# Altium PCB Linux-Capable-Businnes-Card.PcbDoc (part 3 of 4)
Units mil, origin at the board's own origin, x right, y up, seen from the top; angles counter-clockwise.
Board outline 3385.83 x 2125.98 mil, 4 copper layers (L1 (TOP), L2 (GND), L3 (PWR), L4 (BOTTOM)), stack 38.228 mil thick; 154 components, 143 nets, 726 pads, 351 vias.
Unrouted connection lines stored in the file: 1.
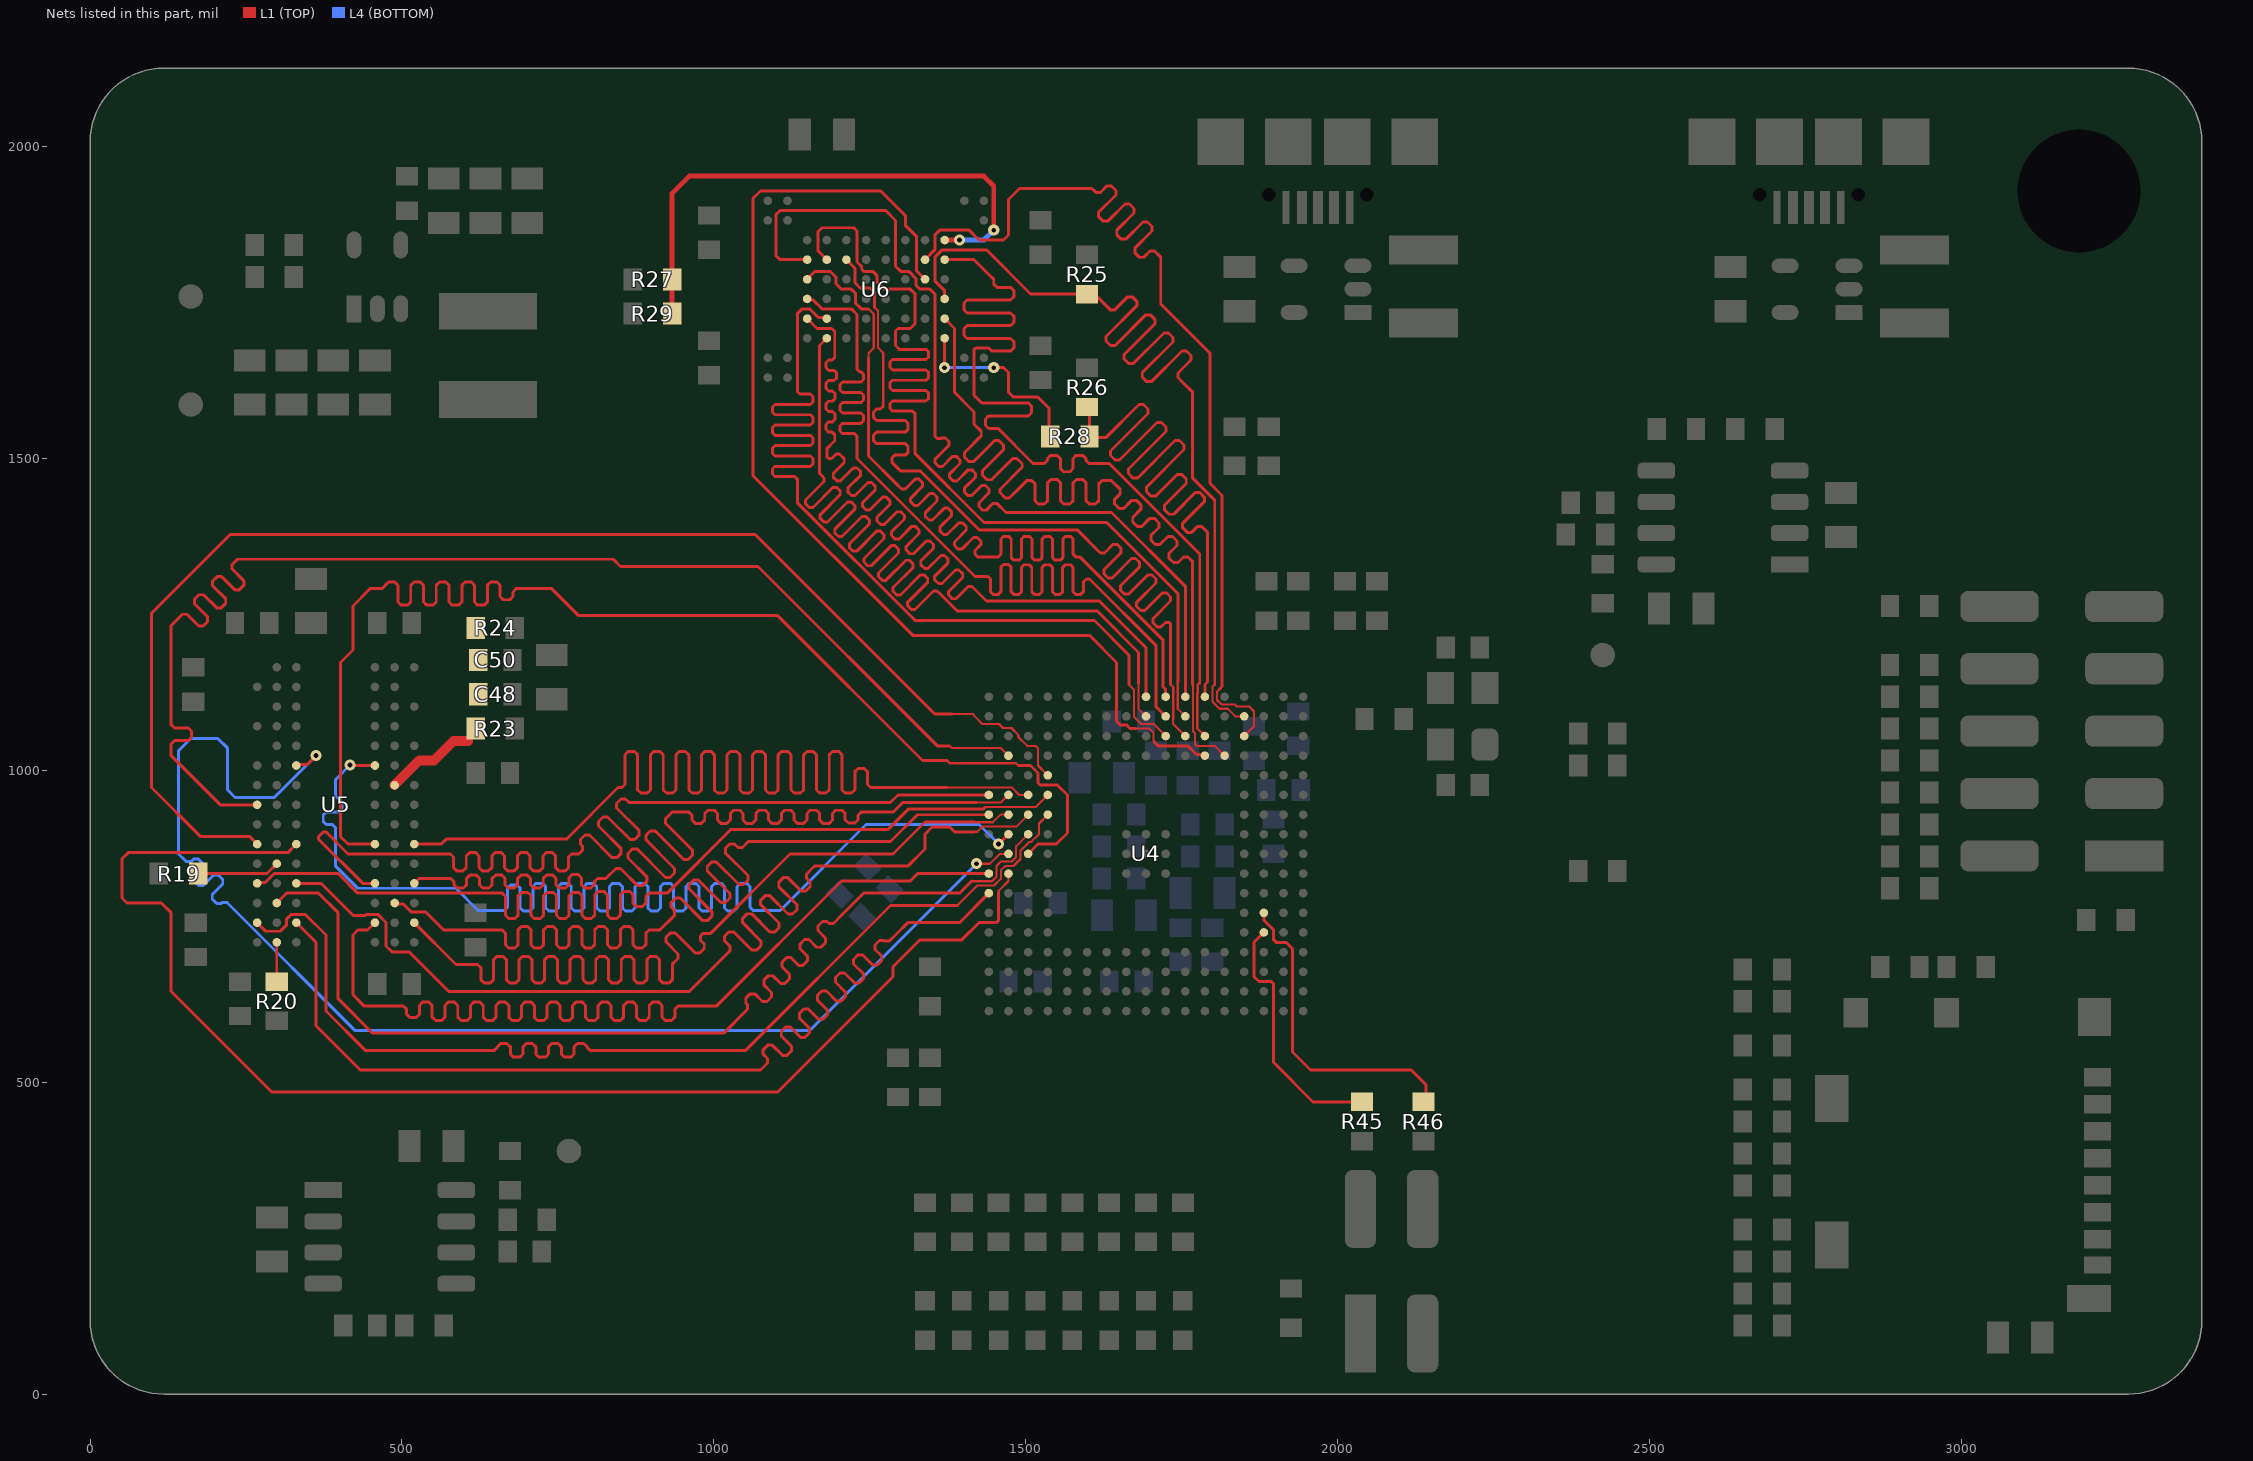
[diagram p5: the nets of this part, all layers, seen from the top]

## Via types
v1: diameter 17.72, hole 7.87, L1 (TOP) to L4 (BOTTOM), tented both sides, 280 vias
v2: diameter 25.59, hole 11.81, L1 (TOP) to L4 (BOTTOM), tented both sides, 71 vias

## Nets (pads, with @x,y where several pads share a name; then routed paths per layer and width w, separated by ;. In a path a pad name is that pad's centre, name@x,y a point inside that pad or via, vN(x,y) a via of type N, cw(c..) or ccw(c..) an arc to the next point about the centre after c; other vN are vias at no path point) (continued)
DRAM_D5: U4.B14 U5.H9 | length 2146.5
  L1 (TOP) w3.54: 1377.95,1039.37 1381.5,1035.83 1460.24,1035.83 U4.B14@1472.44,1023.62
  L1 (TOP) w4.72: U5.H9@267.72,944.88 208.66,944.88 133.86,1019.69 129.92,1023.62 129.92,1042.52 135.04,1047.64 157.29,1047.64 162.4,1052.76 162.4,1062.99 157.29,1068.11 135.04,1068.11 129.92,1073.23 129.92,1078.74 129.92,1232.28 131.89,1234.25 148.04,1250.4 155.27,1250.4 173.99,1231.68 181.23,1231.68 188.47,1238.92 188.47,1246.16 167.42,1267.21 167.42,1274.44 174.66,1281.68 181.9,1281.68 202.94,1260.64 210.18,1260.64 217.42,1267.87 217.42,1275.11 196.37,1296.16 196.37,1303.4 203.61,1310.63 210.85,1310.63 231.89,1289.59 239.13,1289.59 246.37,1296.83 246.37,1304.06 227.66,1322.78 227.66,1330.02 232.28,1334.65 236.22,1338.58 838.58,1338.58 850.39,1326.77 1070.87,1326.77 1358.27,1039.37 1377.95,1039.37
DRAM_D6: U4.C12 U5.F1 | length 2165.2
  L1 (TOP) w3.54: 1374.02,972.44 1425.56,972.44 1425.95,972.83 1477.5,972.83 1489.7,960.63 U4.C12@1503.94,960.63
  L1 (TOP) w4.72: U5.F1@519.69,881.89 562.99,881.89 570.87,889.76 763.78,889.76 846.46,972.44 850,972.44 852.36,972.44 857.48,977.56 857.48,1025.01 862.6,1030.12 872.84,1030.12 877.95,1025.01 877.95,968.74 883.07,963.63 893.31,963.63 898.43,968.74 898.43,1025.01 903.54,1030.12 913.78,1030.12 918.9,1025.01 918.9,968.74 924.02,963.63 934.25,963.63 939.37,968.74 939.37,1025.01 944.49,1030.12 954.72,1030.12 959.84,1025.01 959.84,968.74 964.96,963.63 975.2,963.63 980.32,968.74 980.32,1025.01 985.43,1030.12 995.67,1030.12 1000.79,1025.01 1000.79,968.74 1005.91,963.63 1016.14,963.63 1021.26,968.74 1021.26,1025.01 1026.38,1030.12 1036.61,1030.12 1041.73,1025.01 1041.73,968.74 1046.85,963.63 1057.09,963.63 1062.2,968.74 1062.2,1025.01 1067.32,1030.12 1077.56,1030.12 1082.68,1025.01 1082.68,968.74 1087.8,963.63 1098.03,963.63 1103.15,968.74 1103.15,1025.01 1108.27,1030.12 1118.5,1030.12 1123.62,1025.01 1123.62,968.74 1128.74,963.63 1138.98,963.63 1144.09,968.74 1144.09,1025.01 1149.21,1030.12 1159.45,1030.12 1164.57,1025.01 1164.57,968.74 1169.68,963.63 1179.92,963.63 1185.04,968.74 1185.04,1025.01 1190.16,1030.12 1200.39,1030.12 1205.51,1025.01 1205.51,968.74 1210.63,963.63 1220.87,963.63 1225.98,968.74 1225.98,997.89 1231.1,1003.01 1241.34,1003.01 1246.46,997.89 1246.46,977.56 1251.57,972.44 1255.51,972.44 1374.02,972.44
DRAM_D7: U4.D13 U5.F9 | length 2154
  L1 (TOP) w3.54: 1381.89,1090.55 1415.25,1090.55 1417.32,1088.48 1417.32,1087.62 1430.53,1074.41 1457.09,1074.41 1463.64,1067.86 1477.31,1067.86 1488.19,1056.98 1488.19,1053.61 1502.42,1039.37 1515.75,1039.37 1519.69,1035.43 1519.69,1007.87 U4.D13@1535.43,992.13
  L1 (TOP) w4.72: U5.F9@267.72,881.89 255.91,893.7 177.17,893.7 98.43,972.44 98.43,1251.97 224.41,1377.95 1066.93,1377.95 1354.33,1090.55 1381.89,1090.55
DRAM_D8: U4.C10 U5.C8 | length 1725.8
  L1 (TOP) w3.54: 1412.99,822.44 1446,822.44 1453.15,829.59 1453.15,846.85 1460.24,853.94 1477.5,853.94 1484.65,861.09 1484.65,878.35 U4.C10@1503.94,897.64
  L1 (TOP) w4.72: U5.C8@299.21,787.4 314.96,803.15 366.14,803.15 397.64,771.65 397.64,633.86 452.76,578.74 1015.75,578.74 1052.48,615.47 1054.15,617.14 1054.15,624.38 1051.18,627.34 1051.18,634.58 1058.42,641.82 1065.66,641.82 1077.83,629.64 1085.07,629.64 1092.31,636.88 1092.31,644.12 1080.13,656.3 1080.13,663.54 1087.37,670.77 1094.61,670.77 1106.79,658.6 1114.02,658.6 1121.26,665.83 1121.26,673.07 1109.09,685.25 1109.09,692.49 1116.32,699.73 1123.56,699.73 1135.74,687.55 1142.98,687.55 1150.22,694.79 1150.22,702.02 1138.04,714.2 1138.04,721.44 1145.28,728.68 1152.51,728.68 1164.69,716.5 1171.93,716.5 1179.17,723.74 1179.17,730.98 1166.99,743.15 1166.99,750.39 1174.23,757.63 1181.47,757.63 1184.43,754.66 1191.67,754.66 1206.69,769.69 1240.16,803.15 1393.7,803.15 1412.99,822.44
DRAM_D9: U4.A11 U5.C2 | length 1732.9
  L1 (TOP) w4.72: U5.C2@488.19,787.4 489.92,785.67 501.93,785.67 514.77,772.83 538.19,772.83 566.93,744.09 637.8,744.09 660.63,744.09 665.75,738.98 665.75,720.57 670.87,715.45 681.1,715.45 686.22,720.57 686.22,744.6 691.34,749.71 701.58,749.71 706.69,744.6 706.69,720.57 711.81,715.45 722.05,715.45 727.17,720.57 727.17,744.6 732.28,749.71 742.52,749.71 747.64,744.6 747.64,720.57 752.76,715.45 762.99,715.45 768.11,720.57 768.11,744.6 773.23,749.71 783.46,749.71 788.58,744.6 788.58,720.57 793.7,715.45 803.94,715.45 809.06,720.57 809.06,744.6 814.17,749.71 824.41,749.71 829.53,744.6 829.53,720.57 834.65,715.45 844.88,715.45 850,720.57 850,744.6 855.12,749.71 865.35,749.71 870.47,744.6 870.47,720.57 875.59,715.45 885.83,715.45 890.94,720.57 890.94,738.98 896.06,744.09 902.65,744.09 913.39,744.09 935.55,766.26 937.22,767.93 937.22,775.16 931.54,780.84 931.54,788.08 938.78,795.32 946.02,795.32 982.27,759.06 989.51,759.06 996.75,766.3 996.75,773.54 960.49,809.8 960.49,817.03 967.73,824.27 974.97,824.27 1011.22,788.02 1018.46,788.02 1025.7,795.25 1025.7,802.49 989.44,838.75 989.44,845.99 996.68,853.22 1003.92,853.22 1040.18,816.97 1047.42,816.97 1054.65,824.21 1054.65,831.44 1018.4,867.7 1018.4,874.94 1025.64,882.18 1032.87,882.18 1038.55,876.5 1045.79,876.5 1055.12,885.83 1283.46,885.83 1326.57,928.94 1440.75,928.94 U4.A11@1440.94,929.13
DRAM_D10: U4.C11 U5.D7 | length 1744.5
  L1 (TOP) w3.54: 1417.32,901.57 1422.43,901.57 1430.69,909.84 1484.65,909.84 U4.C11@1503.94,929.13
  L1 (TOP) w4.72: U5.D7@330.71,818.9 370.08,818.9 421.26,767.72 441.13,767.72 442.12,768.7 461.99,768.7 474.41,756.28 474.41,718.5 484.25,708.66 511.81,708.66 574.8,645.67 960.63,645.67 1024.16,709.2 1025.83,710.87 1025.83,718.11 1017.23,726.71 1017.23,733.95 1024.46,741.19 1031.7,741.19 1061.18,711.71 1068.42,711.71 1075.66,718.95 1075.66,726.19 1046.18,755.67 1046.18,762.9 1053.42,770.14 1060.65,770.14 1090.13,740.66 1097.37,740.66 1104.61,747.9 1104.61,755.14 1075.13,784.62 1075.13,791.86 1082.37,799.09 1089.61,799.09 1119.08,769.62 1126.32,769.62 1133.56,776.85 1133.56,784.09 1104.08,813.57 1104.08,820.81 1111.32,828.05 1118.56,828.05 1140.15,806.46 1147.38,806.46 1154.62,813.7 1154.62,820.93 1148.88,826.68 1148.88,833.92 1157.48,842.52 1161.42,846.46 1311.02,846.46 1338.58,874.02 1338.58,897.64 1350,909.06 1378.35,909.06 1385.83,901.57 1417.32,901.57
DRAM_D11: U4.A12 U5.D3 | length 1724.1
  L1 (TOP) w4.72: U5.D3@456.69,818.9 437.01,818.9 366.13,889.78 366.13,893.69 374.03,901.59 377.94,901.59 413.39,866.14 554.62,866.14 577.46,866.14 582.57,861.02 582.57,844.09 587.69,838.98 597.93,838.98 603.05,844.09 603.05,862.92 608.16,868.04 618.4,868.04 623.52,862.92 623.52,844.09 628.64,838.98 638.87,838.98 643.99,844.09 643.99,862.92 649.11,868.04 659.35,868.04 664.46,862.92 664.46,844.09 669.58,838.98 679.82,838.98 684.94,844.09 684.94,862.92 690.05,868.04 700.29,868.04 705.41,862.92 705.41,844.09 710.53,838.98 720.76,838.98 725.88,844.09 725.88,862.92 731,868.04 741.24,868.04 746.35,862.92 746.35,844.09 751.47,838.98 761.71,838.98 766.83,844.09 766.83,861.02 771.94,866.14 782.65,866.14 783.46,866.14 787.4,870.08 789.07,871.75 789.07,878.99 786.11,881.95 786.11,889.19 793.34,896.43 800.58,896.43 836.93,860.09 844.16,860.09 851.4,867.32 851.4,874.56 815.06,910.91 815.06,918.14 822.3,925.38 829.53,925.38 865.88,889.04 873.12,889.04 880.35,896.28 880.35,903.51 844.01,939.86 844.01,947.1 851.25,954.34 858.49,954.34 864,948.82 871.24,948.82 877.95,948.82 1283.46,948.82 1295.28,960.63 U4.A12@1440.94,960.63
DRAM_D12: U4.B12 U5.D1 | length 1744.5
  L1 (TOP) w3.54: 1421.26,948.82 1421.65,948.43 1460.24,948.43 U4.B12@1472.44,960.63
  L1 (TOP) w4.72: U5.D1@519.69,818.9 527.56,826.77 555.23,826.77 578.07,826.77 583.18,821.65 583.18,816.54 588.3,811.42 598.54,811.42 603.66,816.54 603.66,826.93 608.77,832.05 619.01,832.05 624.13,826.93 624.13,816.54 629.25,811.42 639.48,811.42 644.6,816.54 644.6,826.93 649.72,832.05 659.96,832.05 665.07,826.93 665.07,816.54 670.19,811.42 680.43,811.42 685.55,816.54 685.55,826.93 690.66,832.05 700.9,832.05 706.02,826.93 706.02,816.54 711.14,811.42 721.37,811.42 726.49,816.54 726.49,826.93 731.61,832.05 741.85,832.05 746.96,826.93 746.96,816.54 752.08,811.42 762.32,811.42 767.44,816.54 767.44,827.71 772.55,832.82 782.79,832.82 787.91,827.71 787.91,816.54 793.03,811.42 803.26,811.42 808.38,816.54 808.38,821.65 813.5,826.77 816.47,826.77 826.77,826.77 842.92,842.92 850.16,842.92 878.04,815.04 885.28,815.04 892.51,822.27 892.51,829.51 862.28,859.75 862.28,866.99 869.52,874.22 876.76,874.22 922.64,828.34 929.88,828.34 937.12,835.58 937.12,842.82 891.23,888.7 891.23,895.94 898.47,903.18 905.71,903.18 951.59,857.29 958.83,857.29 966.07,864.53 966.07,871.77 922.54,915.3 922.54,922.54 933.07,933.07 936.68,933.07 937.01,933.07 959.84,933.07 964.96,927.95 964.96,920.31 970.08,915.19 980.32,915.19 985.43,920.31 985.43,931 990.55,936.12 1000.79,936.12 1005.91,931 1005.91,920.31 1011.02,915.19 1021.26,915.19 1026.38,920.31 1026.38,931 1031.5,936.12 1041.73,936.12 1046.85,931 1046.85,920.31 1051.97,915.19 1062.21,915.19 1067.32,920.31 1067.32,931 1072.44,936.12 1082.68,936.12 1087.8,931 1087.8,920.31 1092.91,915.19 1103.15,915.19 1108.27,920.31 1108.27,931 1113.39,936.12 1123.62,936.12 1128.74,931 1128.74,920.31 1133.86,915.19 1144.09,915.19 1149.21,920.31 1149.21,931 1154.33,936.12 1164.57,936.12 1169.69,931 1169.69,920.31 1174.8,915.19 1185.04,915.19 1190.16,920.31 1190.16,931 1195.28,936.12 1205.51,936.12 1210.63,931 1210.63,920.68 1215.75,915.56 1225.98,915.56 1231.1,920.68 1231.1,927.95 1236.22,933.07 1248.07,933.07 1287.4,933.07 1303.15,948.82 1421.26,948.82
DRAM_D13: U4.D12 U5.D9 | length 1744.9
  L1 (TOP) w3.54: 1434.88,940.33 1435.89,941.34 1516.14,941.34 U4.D12@1535.43,960.63
  L1 (TOP) w4.72: U5.D9@267.72,818.9 269.45,820.63 281.35,820.63 295.36,834.65 397.64,834.65 429.13,803.15 637.8,803.15 660.63,803.15 665.75,798.03 665.75,767.86 670.87,762.74 681.1,762.74 686.22,767.86 686.22,799.33 691.34,804.44 701.58,804.44 706.69,799.33 706.69,767.86 711.81,762.74 722.05,762.74 727.17,767.86 727.17,799.33 732.28,804.44 742.52,804.44 747.64,799.33 747.64,767.86 752.76,762.74 762.99,762.74 768.11,767.86 768.11,799.33 773.23,804.44 783.46,804.44 788.58,799.33 788.58,767.86 793.7,762.74 803.94,762.74 809.06,767.86 809.06,800.4 814.17,805.52 824.41,805.52 829.53,800.4 829.53,767.86 834.65,762.74 844.88,762.74 850,767.86 850,800.8 855.12,805.92 865.35,805.92 870.47,800.8 870.47,787.06 875.59,781.94 885.83,781.94 890.94,787.06 890.94,798.03 896.06,803.15 909.95,803.15 925.2,803.15 1027.56,905.51 1279.53,905.51 1311.81,937.8 1431.51,937.8 1434.46,940.75
DRAM_D14: U4.B11 U5.B1 | length 1731.3
  L1 (TOP) w3.54: 1417.72,916.93 1447.24,916.93 1459.44,929.13 U4.B11@1472.44,929.13
  L1 (TOP) w4.72: U5.B1@519.69,755.91 586.61,688.98 598.43,688.98 621.26,688.98 626.38,683.86 626.38,664.48 631.5,659.37 641.73,659.37 646.85,664.48 646.85,696.4 651.97,701.51 662.21,701.51 667.32,696.4 667.32,664.48 672.44,659.37 682.68,659.37 687.8,664.48 687.8,696.4 692.91,701.51 703.15,701.51 708.27,696.4 708.27,664.48 713.39,659.37 723.62,659.37 728.74,664.48 728.74,696.4 733.86,701.51 744.09,701.51 749.21,696.4 749.21,664.48 754.33,659.37 764.57,659.37 769.69,664.48 769.69,696.4 774.8,701.51 785.04,701.51 790.16,696.4 790.16,664.48 795.28,659.37 805.51,659.37 810.63,664.48 810.63,696.4 815.75,701.51 825.98,701.51 831.1,696.4 831.1,664.48 836.22,659.37 846.46,659.37 851.57,664.48 851.57,696.4 856.69,701.51 866.93,701.51 872.05,696.4 872.05,664.48 877.17,659.37 887.4,659.37 892.52,664.48 892.52,696.4 897.64,701.51 907.87,701.51 912.99,696.4 912.99,664.48 918.11,659.37 928.35,659.37 933.46,664.48 933.46,689.37 940.94,696.85 942.62,698.52 942.62,705.76 923.2,725.18 923.2,732.41 930.44,739.65 937.68,739.65 970.17,707.16 977.41,707.16 984.65,714.39 984.65,721.63 978.81,727.47 978.81,734.71 982.26,738.17 994.07,738.17 1122.05,866.14 1287.4,866.14 1338.58,917.32 1417.32,917.32 1417.72,916.93
DRAM_D15: U4.D11 U5.B9 | length 1739.7
  L1 (TOP) w3.54: 1390.37,783.46 1422.26,815.35 1449.21,815.35 1460.24,826.38 1460.24,839.7 1467.39,846.85 1477.5,846.85 1477.63,846.71 1480.57,846.71 1491.73,857.87 1491.73,871.2 1505.97,885.43 1508.99,885.43 1521.23,897.67 1521.23,914.93 U4.D11@1535.43,929.13
  L1 (TOP) w4.72: U5.B9@267.72,755.91 281.5,742.13 304.92,742.13 315.16,752.37 315.16,762.02 321.85,768.71 345.47,768.7 377.95,736.22 377.95,614.17 440.94,551.18 645.67,551.18 648.03,551.18 653.15,556.3 653.15,557.08 658.27,562.2 668.5,562.2 673.62,557.08 673.62,545.39 678.74,540.28 688.98,540.28 694.09,545.39 694.09,557.08 699.21,562.2 709.45,562.2 714.57,557.08 714.57,545.39 719.69,540.28 729.92,540.28 735.04,545.39 735.04,557.08 740.16,562.2 750.39,562.2 755.51,557.08 755.51,545.39 760.63,540.28 770.87,540.28 775.98,545.39 775.98,557.08 781.1,562.2 791.34,562.2 796.46,557.08 796.46,556.3 801.57,551.18 894.65,551.18 1051.18,551.18 1283.46,783.46 1390.37,783.46
DRAM_LDM: U4.C9 U5.F3 | length 2165.2
  L1 (TOP) w3.54: 1377.95,1011.81 1378.35,1011.42 1484.65,1011.42 1488.19,1007.87
  L1 (TOP) w4.72: U5.F3@456.69,881.89 413.39,881.89 401.57,893.7 401.57,1173.23 421.26,1192.91 421.26,1263.78 448.82,1291.34 465.58,1291.34 467.94,1291.34 473.06,1296.46 473.06,1296.8 478.18,1301.92 488.41,1301.92 493.53,1296.8 493.53,1270.12 498.65,1265 508.88,1265 514,1270.12 514,1296.8 519.12,1301.92 529.36,1301.92 534.47,1296.8 534.47,1270.12 539.59,1265 549.83,1265 554.95,1270.12 554.95,1296.8 560.06,1301.92 570.3,1301.92 575.42,1296.8 575.42,1270.12 580.54,1265 590.77,1265 595.89,1270.12 595.89,1296.8 601.01,1301.92 611.25,1301.92 616.36,1296.8 616.36,1270.12 621.48,1265 631.72,1265 636.84,1270.12 636.84,1296.8 641.95,1301.92 652.19,1301.92 657.31,1296.8 657.31,1278.79 662.43,1273.67 672.66,1273.67 677.78,1278.79 677.78,1286.22 682.9,1291.34 700.09,1291.34 740.16,1291.34 783.46,1248.03 1102.36,1248.03 1334.65,1015.75 1374.02,1015.75 1377.95,1011.81 ; 1488.19,1007.87 1507.87,1007.87 1519.69,996.06 1519.69,980.31 1523.62,976.38 1551.18,976.38 1566.93,960.63 1566.93,899.84 1548.98,881.89 1519.69,881.89 U4.C9@1503.94,866.14
DRAM_LDQSn: R19.2 U5.E8 | length 135
  L1 (TOP) w4.72: R19.2@173.23,834.65 283.46,834.65 U5.E8@299.21,850.39 U5.E8@300.95,852.13
DRAM_LDQSp: U4.B8 U5.F7 | length 2165.2
  L1 (TOP) w3.54: 1456.69,803.15 1456.69,807.09 1472.44,822.83 U4.B8@1472.44,834.65
  L1 (TOP) w4.72: U5.F7@330.71,881.89 316.93,868.11 61.02,868.11 51.18,858.27 51.18,795.28 59.06,787.4 114.17,787.4 129.92,771.65 129.92,645.67 291.34,484.25 1102.36,484.25 1287.4,669.29 1287.4,685.04 1330.71,728.35 1397.64,728.35 1425.2,755.91 1452.76,755.91 1456.69,759.84 1456.69,803.15
DRAM_RAS: U4.B9 U5.K7 | length 2198.6
  L1 (TOP) w3.54: v1(1421.26,850.39) 1442.46,850.39 1458.2,866.14 U4.B9@1472.44,866.14
  L1 (TOP) w4.72: U5.K7@332.44,1009.61 348.19,1009.61 v1(362.2,1023.62)
  L4 (BOTTOM) w4.72: v1(362.2,1023.62) 295.28,956.69 232.28,956.69 220.47,968.5 220.47,1035.43 204.72,1051.18 161.42,1051.18 141.73,1031.5 141.73,866.14 152.04,855.84 154.27,853.6 161.51,853.6 166.08,858.17 173.32,858.17 180.56,850.93 180.56,843.69 166.84,829.98 166.84,822.74 174.08,815.5 181.32,815.5 198.16,832.35 205.4,832.35 212.64,825.11 212.64,817.87 195.79,801.03 195.79,793.79 203.03,786.55 210.27,786.55 212.18,788.46 219.42,788.46 221.09,786.79 425.2,582.68 1153.54,582.68 1334.65,763.78 v1(1421.26,850.39)
DRAM_UDM: U4.A8 U5.B3 | length 1744.5
  L1 (TOP) w4.72: U5.B3@456.69,755.91 444.88,744.09 429.13,744.09 421.26,736.22 421.26,640.44 439.66,622.05 484.56,622.05 502.36,622.05 507.48,616.93 507.48,608.86 512.6,603.74 522.84,603.74 527.95,608.86 527.95,623.26 533.07,628.37 543.31,628.37 548.43,623.26 548.43,604.24 553.54,599.12 563.78,599.12 568.9,604.24 568.9,623.26 574.02,628.37 584.25,628.37 589.37,623.26 589.37,604.24 594.49,599.12 604.72,599.12 609.84,604.24 609.84,623.26 614.96,628.37 625.2,628.37 630.32,623.26 630.32,604.24 635.43,599.12 645.67,599.12 650.79,604.24 650.79,623.26 655.91,628.37 666.14,628.37 671.26,623.26 671.26,604.24 676.38,599.12 686.61,599.12 691.73,604.24 691.73,623.26 696.85,628.37 707.09,628.37 712.2,623.26 712.2,604.24 717.32,599.12 727.56,599.12 732.68,604.24 732.68,623.26 737.8,628.37 748.03,628.37 753.15,623.26 753.15,604.24 758.27,599.12 768.5,599.12 773.62,604.24 773.62,623.26 778.74,628.37 788.98,628.37 794.09,623.26 794.09,604.24 799.21,599.12 809.45,599.12 814.57,604.24 814.57,623.26 819.68,628.37 829.92,628.37 835.04,623.26 835.04,604.24 840.16,599.12 850.39,599.12 855.51,604.24 855.51,623.26 860.63,628.37 870.87,628.37 875.98,623.26 875.98,604.24 881.1,599.12 891.34,599.12 896.46,604.24 896.46,623.26 901.57,628.37 911.81,628.37 916.93,623.26 916.93,604.24 922.05,599.12 932.28,599.12 937.4,604.24 937.4,616.93 942.52,622.05 944.88,622.05 1003.94,622.05 1204.72,822.83 1314.96,822.83 1326.77,834.65 U4.A8@1440.94,834.65
DRAM_UDQSn: R20.2 U5.A8 | length 63
  L1 (TOP) w4.72: R20.2@299.21,661.42 U5.A8@299.21,724.41
DRAM_UDQSp: U4.A7 U5.B7 | length 1744.5
  L1 (TOP) w4.72: U5.B7@330.71,755.91 362.2,724.41 362.2,590.55 433.07,519.69 1074.8,519.69 1084.33,529.21 1086,530.88 1086,538.12 1079.1,545.02 1079.09,552.26 1086.33,559.5 1093.57,559.5 1109.95,543.12 1117.19,543.12 1124.42,550.36 1124.42,557.6 1108.05,573.98 1108.05,581.21 1115.29,588.45 1122.52,588.45 1138.9,572.07 1146.14,572.07 1153.38,579.31 1153.38,586.55 1137,602.93 1137,610.17 1144.24,617.4 1151.48,617.4 1167.85,601.03 1175.09,601.03 1182.33,608.26 1182.33,615.5 1165.95,631.88 1165.95,639.12 1173.19,646.36 1180.43,646.36 1196.81,629.98 1204.04,629.98 1211.28,637.22 1211.28,644.45 1194.9,660.83 1194.9,668.07 1202.14,675.31 1209.38,675.31 1225.76,658.93 1233,658.93 1240.23,666.17 1240.23,673.41 1223.86,689.78 1223.86,697.02 1231.09,704.26 1238.33,704.26 1254.71,687.88 1261.95,687.88 1269.19,695.12 1269.19,702.36 1258.55,712.99 1258.55,720.23 1265.79,727.47 1273.03,727.47 1274.19,726.31 1281.43,726.31 1292.91,737.79 1311.02,755.91 1393.7,755.91 U4.A7@1440.94,803.15
DRAM_VREF: C48.1 C50.2 R23.1 R24.2 U5.J2 | length 147.5
  L1 (TOP) w15.75: U5.J2@488.19,976.38 527.56,1015.75 551.18,1015.75 582.68,1047.24 606.3,1047.24
DRAM_WE: U4.B10 U5.K3 | length 2199.7
  L1 (TOP) w4.72: v1@417.32,1007.87 U5.K3@456.69,1007.87 ; v1(1456.69,881.89) U4.B10@1472.44,897.64
  L4 (BOTTOM) w4.72: v1(416.73,1008.47) 393.7,985.45 393.7,959.06 398.82,953.94 403.94,948.82 403.94,938.58 398.82,933.46 378.88,933.46 373.76,928.35 373.76,918.11 378.88,912.99 388.58,912.99 393.7,907.87 393.7,846.46 429.13,811.02 586.61,811.02 622.05,775.59 625.98,775.59 663.86,775.59 668.98,780.71 668.98,811.32 674.1,816.44 684.34,816.44 689.45,811.32 689.45,779.58 694.57,774.46 704.81,774.46 709.93,779.58 709.93,813.78 715.05,818.9 725.28,818.9 730.4,813.78 730.4,779.58 735.52,774.46 745.75,774.46 750.87,779.58 750.87,813.78 755.99,818.9 766.23,818.9 771.34,813.78 771.34,779.58 776.46,774.46 786.7,774.46 791.82,779.58 791.82,813.78 796.93,818.9 807.17,818.9 812.29,813.78 812.29,779.58 817.41,774.46 827.64,774.46 832.76,779.58 832.76,813.78 837.88,818.9 848.12,818.9 853.23,813.78 853.23,779.58 858.35,774.46 868.59,774.46 873.71,779.58 873.71,813.78 878.82,818.9 889.06,818.9 894.18,813.78 894.18,779.58 899.3,774.46 909.53,774.46 914.65,779.58 914.65,813.78 919.77,818.9 930.01,818.9 935.12,813.78 935.12,779.58 940.24,774.46 950.48,774.46 955.6,779.58 955.6,813.78 960.71,818.9 970.95,818.9 976.07,813.78 976.07,779.58 981.19,774.46 991.42,774.46 996.54,779.58 996.54,813.78 1001.66,818.9 1011.89,818.9 1017.01,813.78 1017.01,779.58 1022.13,774.46 1032.37,774.46 1037.49,779.58 1037.49,813.78 1042.6,818.9 1052.84,818.9 1057.96,813.78 1057.96,780.71 1063.08,775.59 1085.91,775.59 1106.3,775.59 1244.09,913.39 1425.2,913.39 v1(1456.69,881.89)
DRXD: R45.2 U4.R5 | length 407.6
  L1 (TOP) w4.72: U4.R5@1881.89,740.16 1866.14,724.41 1866.14,669.29 1874.02,661.42 1893.7,661.42 1897.64,657.48 1897.64,531.5 1960.63,468.5 R45.2@2039.37,468.5
DTXD: R46.2 U4.R6 | length 516.2
  L1 (TOP) w4.72: U4.R6@1881.89,771.65 1882.47,771.08 1882.47,759.27 1897.64,744.09 1897.64,728.35 1901.57,724.41 1917.32,724.41 1927.85,713.89 1927.85,548.53 1956.69,519.69 2118.11,519.69 2141.73,496.06 2141.73,472.44 R46.2@2137.8,468.5
FLASH_ALE: U4.M15 U6.C4 | length 1645.8
  L1 (TOP) w3.54: 1775.79,1137.8 1775.79,1123.76 1775.2,1123.17 1775.2,1067.32 U4.M15@1787.4,1055.12
  L1 (TOP) w4.72: U6.C4@1370.08,1818.9 1417.32,1818.9 1440.94,1795.28 1448.82,1787.4 1448.82,1779.65 1453.94,1774.53 1475.83,1774.53 1480.94,1769.41 1480.94,1759.18 1475.83,1754.06 1406.06,1754.06 1400.94,1748.94 1400.94,1738.71 1406.06,1733.59 1475.83,1733.59 1480.94,1728.47 1480.94,1718.23 1475.83,1713.11 1406.06,1713.11 1400.94,1708 1400.94,1697.76 1406.06,1692.64 1475.83,1692.64 1480.94,1687.52 1480.94,1677.29 1475.83,1672.17 1445.94,1672.17 1440.94,1677.17 1420.09,1677.17 1417.32,1674.4 1417.32,1601.19 1420.09,1598.43 1420.24,1598.43 1429.69,1588.98 1504.34,1588.98 1509.46,1583.86 1509.46,1573.62 1504.34,1568.5 1440.9,1568.5 1435.78,1563.39 1435.78,1553.15 1440.9,1548.03 1455.9,1548.03 1511.81,1492.13 1527.56,1492.13 1529.92,1492.13 1535.04,1497.24 1535.04,1500.1 1540.16,1505.21 1550.39,1505.21 1555.51,1500.1 1555.51,1483.95 1560.63,1478.83 1570.87,1478.83 1575.98,1483.95 1575.98,1500.1 1581.1,1505.21 1591.34,1505.21 1596.46,1500.1 1596.46,1497.24 1601.58,1492.13 1610.24,1492.13 1633.86,1492.13 1779.13,1346.85 1779.13,1140.55 1776.38,1137.8
FLASH_CLE: U4.M14 U6.D5 | length 1797.7
  L1 (TOP) w3.54: 1677.17,1067.32 1697.97,1067.32 1705.12,1060.17 1705.12,1047.67
  L1 (TOP) w4.72: U6.D5@1338.58,1787.4 1324.62,1801.37 1324.62,1856.48 1307.09,1874.02 1307.09,1889.76 1267.72,1929.13 1074.8,1929.13 1062.99,1917.32 1062.99,1472.44 1318.9,1216.54 1602.36,1216.54 1645.67,1173.23 1645.67,1078.74 1651.38,1073.03 1661.6,1073.03 1667.31,1067.32 1677.17,1067.32 ; 1705.48,1046.49 1712.6,1039.37 1759.75,1039.37 1773.77,1025.35 1785.67,1025.35 U4.M14@1787.4,1023.62
FLASH_CS: R25.1 U4.P16 U6.C6 | length 1673.4
  L1 (TOP) w3.54: 1803.15,1137.8 1799.61,1134.25 1799.61,1110.12 1810.91,1098.82 1823.95,1098.82 1836.16,1086.61 U4.P16@1850.39,1086.61
  L1 (TOP) w4.72: U6.C6@1370.08,1755.91 1369.5,1756.48 1369.5,1769.88 1354.33,1785.05 1354.33,1822.83 1366.14,1834.65 1437.01,1834.65 1507.87,1763.78 R25.1@1598.43,1763.78 ; R25.1@1601.38,1775.59 1613.78,1763.19 1613.78,1760.24 1633.86,1740.16 1635.53,1738.49 1642.77,1738.49 1663.68,1759.4 1670.92,1759.4 1678.16,1752.17 1678.16,1744.93 1628.96,1695.73 1628.96,1688.49 1636.2,1681.25 1643.44,1681.25 1692.64,1730.45 1699.87,1730.45 1707.11,1723.21 1707.11,1715.97 1657.91,1666.77 1657.91,1659.54 1665.15,1652.3 1672.39,1652.3 1721.59,1701.5 1728.83,1701.5 1736.06,1694.26 1736.06,1687.02 1686.86,1637.82 1686.86,1630.58 1694.1,1623.35 1701.34,1623.35 1750.54,1672.55 1757.78,1672.55 1765.02,1665.31 1765.02,1658.07 1744.1,1637.15 1744.1,1629.92 1751.97,1622.05 1767.72,1606.3 1767.72,1468.5 1803.15,1433.07 1803.15,1137.8
FLASH_D0: U4.L15 U6.H4 | length 1641.7
  L1 (TOP) w3.54: 1257.87,1742.13 1263.39,1736.61 1263.39,1677.56 1271.65,1669.29 1271.65,1661.42 ; 1732.28,1137.8 1736.61,1133.46 1736.61,1081.56 1736.22,1081.17 1736.22,1074.8 U4.L15@1755.91,1055.12
  L1 (TOP) w4.72: U6.H4@1212.6,1818.9 1226.56,1804.93 1226.56,1781.31 1234.34,1773.53 1250.09,1773.53 1257.87,1765.75 1257.87,1742.13 ; 1271.65,1661.42 1271.65,1591.38 1271.65,1584.01 1267.03,1579.38 1260.93,1579.38 1256.3,1574.76 1256.3,1565.51 1260.93,1560.88 1307.03,1560.88 1311.65,1556.25 1311.65,1547 1307.03,1542.38 1260.93,1542.38 1256.3,1537.75 1256.3,1528.5 1260.93,1523.87 1307.03,1523.87 1311.65,1519.25 1311.65,1509.99 1307.03,1505.37 1289.95,1505.37 1285.33,1500.74 1285.33,1494.2 1295.03,1484.5 1299.21,1480.32 1330.71,1480.32 1425.2,1385.83 1582.68,1385.83 1618.11,1350.39 1619.78,1348.72 1626.32,1348.72 1640.08,1362.48 1646.62,1362.48 1653.16,1355.93 1653.16,1349.39 1625.57,1321.8 1625.57,1315.26 1632.11,1308.72 1638.65,1308.72 1669.63,1339.69 1676.17,1339.69 1682.72,1333.15 1682.72,1326.61 1651.74,1295.63 1651.74,1289.09 1658.28,1282.55 1664.82,1282.55 1695.8,1313.53 1702.34,1313.53 1708.88,1306.98 1708.88,1300.44 1677.91,1269.46 1677.91,1262.92 1684.45,1256.38 1690.99,1256.38 1719.29,1284.68 1725.83,1284.68 1732.37,1278.13 1732.37,1271.59 1704.07,1243.29 1704.07,1236.75 1710.62,1230.21 1717.16,1230.21 1723.98,1237.03 1730.52,1237.03 1732.28,1235.26 1732.28,1231.92 1732.28,1137.8
FLASH_D1: U4.L16 U6.J4 | length 1657
  L1 (TOP) w3.54: 1743.7,1141.73 1743.7,1098.82 U4.L16@1755.91,1086.61
  L1 (TOP) w4.72: U6.J4@1181.1,1818.9 1167.31,1832.69 1167.31,1864.16 1173.23,1870.08 1224.41,1870.08 1229.63,1864.85 1229.63,1815.26 1237.17,1807.73 1237.17,1802.96 1239.93,1800.2 1254.92,1800.2 1261.32,1793.8 1261.32,1783.58 1273.24,1771.65 1314.96,1771.65 1322.83,1763.78 1322.83,1716.54 1314.96,1708.66 1295.28,1708.66 1291.34,1704.72 1291.34,1681.1 1297.25,1675.19 1340.28,1675.19 1344.41,1671.06 1344.41,1662.79 1340.28,1658.66 1286.38,1658.66 1282.25,1654.53 1282.25,1646.26 1286.38,1642.12 1340.28,1642.12 1344.41,1637.99 1344.41,1629.72 1340.28,1625.59 1286.38,1625.59 1282.25,1621.45 1282.25,1613.19 1286.38,1609.05 1340.28,1609.05 1344.41,1604.92 1344.41,1596.65 1340.28,1592.52 1286.38,1592.52 1282.25,1588.38 1282.25,1580.12 1286.38,1575.98 1318.7,1575.98 1322.83,1571.85 1322.83,1507.87 1433.07,1397.64 1629.92,1397.64 1743.91,1283.65 1743.91,1141.94 1743.7,1141.73
FLASH_D2: U4.L17 U6.K4 | length 1612
  L1 (TOP) w4.72: U6.K4@1149.61,1818.9 1106.3,1818.9 1099.41,1825.79 1099.41,1890.75 1106.3,1897.64 1275.59,1897.64 1291.34,1881.89 1291.34,1808.47 1299.61,1800.2 1312.39,1800.2 1324.31,1788.27 1324.31,1778.05 1330.71,1771.65 1346.46,1771.65 1354.33,1763.78 1354.33,1539.37 1354.33,1536.03 1358.46,1531.89 1364.31,1531.89 1365.44,1533.03 1371.29,1533.03 1377.14,1527.18 1377.14,1521.34 1354.81,1499.01 1354.81,1493.16 1360.66,1487.32 1366.5,1487.32 1382.85,1503.67 1388.7,1503.67 1394.55,1497.82 1394.55,1491.98 1378.19,1475.62 1378.19,1469.78 1384.04,1463.93 1389.89,1463.93 1407.86,1481.91 1413.71,1481.91 1419.56,1476.06 1419.56,1470.22 1401.58,1452.24 1401.58,1446.39 1407.43,1440.55 1413.27,1440.55 1429.64,1456.91 1435.48,1456.91 1441.33,1451.07 1441.33,1445.22 1424.96,1428.86 1424.96,1423.01 1430.81,1417.16 1436.66,1417.16 1447.77,1428.28 1453.61,1428.28 1468.5,1413.39 1637.8,1413.39 1755.91,1295.28 U4.L17@1755.91,1118.11
FLASH_D3: U4.K17 U6.K5 | length 1611.3
  L1 (TOP) w3.54: 1248.03,1661.42 1248.03,1668.9 1256.3,1677.17 1256.3,1731.89 1248.03,1740.16
  L1 (TOP) w4.72: U6.K5@1149.61,1787.4 1162.4,1800.2 1186.4,1800.2 1195.56,1791.04 1195.56,1780.81 1204.72,1771.65 1220.47,1771.65 1226.87,1765.26 1226.87,1749.51 1236.22,1740.16 1248.03,1740.16 ; 1248.03,1661.42 1248.03,1503.94 1292.46,1459.51 1300.9,1451.07 1306.74,1451.07 1322.85,1467.18 1328.7,1467.18 1334.54,1461.33 1334.54,1455.49 1315.58,1436.53 1315.58,1430.69 1321.43,1424.84 1327.28,1424.84 1346.23,1443.8 1352.08,1443.8 1357.93,1437.95 1357.93,1432.1 1338.97,1413.15 1338.97,1407.3 1344.82,1401.45 1350.66,1401.45 1369.62,1420.41 1375.46,1420.41 1381.31,1414.57 1381.31,1408.72 1362.35,1389.76 1362.35,1383.92 1368.2,1378.07 1374.05,1378.07 1393,1397.03 1398.85,1397.03 1404.7,1391.18 1404.7,1385.33 1385.74,1366.38 1385.74,1360.53 1391.58,1354.69 1397.43,1354.69 1416.39,1373.64 1422.23,1373.64 1428.08,1367.8 1428.08,1361.95 1418.63,1352.5 1418.63,1346.65 1422.76,1342.52 1435.38,1342.52 1453.85,1342.52 1456.21,1342.52 1460.35,1346.65 1460.35,1371.16 1464.48,1375.3 1472.75,1375.3 1476.88,1371.16 1476.88,1341.15 1481.02,1337.02 1489.29,1337.02 1493.42,1341.15 1493.42,1371.16 1497.55,1375.3 1505.82,1375.3 1509.95,1371.16 1509.95,1341.15 1514.09,1337.02 1522.36,1337.02 1526.49,1341.15 1526.49,1371.16 1530.62,1375.3 1538.89,1375.3 1543.03,1371.16 1543.03,1341.15 1547.16,1337.02 1555.43,1337.02 1559.56,1341.15 1559.56,1371.16 1563.69,1375.3 1571.96,1375.3 1576.1,1371.16 1576.1,1346.65 1580.23,1342.52 1583.58,1342.52 1586.61,1342.52 1720.47,1208.66 1720.47,1133.86 1724.41,1129.92 U4.K17@1724.41,1118.11
FLASH_D4: U4.K16 U6.K6 | length 1619.7
  L1 (TOP) w4.72: U6.K6@1149.61,1755.91 1150.83,1754.68 1158.7,1754.68 1173.23,1740.16 1220.47,1740.16 1229.63,1731 1229.63,1645.67 1229.63,1643.31 1233.77,1639.17 1235.63,1639.17 1239.76,1635.04 1239.76,1626.77 1235.63,1622.64 1206.3,1622.64 1202.17,1618.5 1202.17,1610.24 1206.3,1606.1 1235.63,1606.1 1239.76,1601.97 1239.76,1593.7 1235.63,1589.57 1206.3,1589.57 1202.17,1585.43 1202.17,1577.17 1206.3,1573.03 1235.63,1573.03 1239.76,1568.9 1239.76,1560.63 1235.63,1556.5 1206.3,1556.5 1202.17,1552.36 1202.17,1544.09 1206.3,1539.96 1225.5,1539.96 1229.63,1535.83 1229.63,1520.96 1229.63,1499.94 1418.55,1311.02 1439.48,1311.02 1443.61,1306.89 1443.61,1286.43 1447.75,1282.29 1456.01,1282.29 1460.15,1286.43 1460.15,1325.84 1464.28,1329.98 1472.55,1329.98 1476.68,1325.84 1476.68,1286.43 1480.82,1282.29 1489.09,1282.29 1493.22,1286.43 1493.22,1325.61 1497.35,1329.75 1505.62,1329.75 1509.75,1325.61 1509.75,1286.43 1513.89,1282.29 1522.16,1282.29 1526.29,1286.43 1526.29,1325.61 1530.42,1329.75 1538.69,1329.75 1542.83,1325.61 1542.83,1286.43 1546.96,1282.29 1555.23,1282.29 1559.36,1286.43 1559.36,1325.61 1563.49,1329.75 1571.76,1329.75 1575.9,1325.61 1575.9,1286.43 1580.03,1282.29 1588.3,1282.29 1592.43,1286.43 1592.43,1302.02 1597.3,1306.89 1602.17,1306.89 1602.36,1307.09 1708.66,1200.79 1708.66,1102.36 U4.K16@1724.41,1086.61
FLASH_D5: U4.K15 U6.J7 | length 1636.5
  L1 (TOP) w3.54: 1665.35,1137.8 1673.62,1129.53 1673.62,1086.22 1685.43,1074.41 1705.12,1074.41 U4.K15@1724.41,1055.12
  L1 (TOP) w4.72: U6.J7@1181.1,1724.41 1179.37,1726.14 1167.47,1726.14 1153.46,1740.16 1141.73,1740.16 1133.86,1732.28 1133.86,1618.11 1133.86,1607.48 1137.99,1603.35 1154.9,1603.35 1159.04,1599.21 1159.04,1590.94 1154.9,1586.81 1097.99,1586.81 1093.86,1582.68 1093.86,1574.41 1097.99,1570.28 1154.9,1570.28 1159.04,1566.14 1159.04,1557.87 1154.9,1553.74 1097.99,1553.74 1093.86,1549.61 1093.86,1541.34 1097.99,1537.21 1154.9,1537.21 1159.04,1533.07 1159.04,1524.8 1154.9,1520.67 1097.99,1520.67 1093.86,1516.54 1093.86,1508.27 1097.99,1504.13 1154.9,1504.13 1159.04,1500 1159.04,1491.73 1154.9,1487.6 1097.99,1487.6 1093.86,1483.46 1093.86,1475.2 1097.99,1471.06 1129.72,1471.06 1133.86,1466.93 1133.86,1464.57 1133.86,1429.13 1322.83,1240.16 1610.24,1240.16 1665.35,1185.04 1665.35,1137.8
FLASH_D6: U4.J17 U6.K7 | length 1649.8
  L1 (TOP) w4.72: U6.K7@1149.61,1724.41 1165.35,1708.66 1188.98,1708.66 1193.9,1703.74 1193.9,1681.1 1193.9,1662.2 1189.76,1658.07 1183.81,1658.07 1179.68,1653.94 1179.68,1645.67 1183.81,1641.54 1192.84,1641.54 1196.97,1637.4 1196.97,1629.13 1192.84,1625 1183.81,1625 1179.68,1620.87 1179.68,1612.6 1183.81,1608.46 1189.96,1608.46 1194.09,1604.33 1194.09,1596.06 1189.96,1591.93 1183.81,1591.93 1179.68,1587.79 1179.68,1579.53 1183.81,1575.39 1189.96,1575.39 1194.09,1571.26 1194.09,1562.99 1189.96,1558.86 1183.81,1558.86 1179.68,1554.72 1179.68,1546.46 1183.81,1542.32 1189.76,1542.32 1193.9,1538.19 1193.9,1528.54 1192.7,1527.34 1181.1,1515.75 1181.1,1502.77 1183.87,1500 1188.98,1500 1196.13,1507.15 1201.51,1507.15 1209.12,1499.54 1209.12,1493.69 1191.46,1476.03 1191.46,1470.18 1197.3,1464.33 1203.15,1464.33 1223.71,1484.9 1229.56,1484.9 1235.4,1479.05 1235.4,1473.2 1214.84,1452.64 1214.84,1446.8 1220.69,1440.95 1226.53,1440.95 1247.1,1461.51 1252.94,1461.51 1258.79,1455.67 1258.79,1449.82 1238.23,1429.26 1238.23,1423.41 1244.07,1417.56 1249.92,1417.56 1270.48,1438.13 1276.33,1438.13 1282.17,1432.28 1282.17,1426.44 1261.61,1405.87 1261.61,1400.03 1267.46,1394.18 1273.3,1394.18 1293.87,1414.74 1299.71,1414.74 1305.56,1408.9 1305.56,1403.05 1284.99,1382.49 1284.99,1376.64 1290.84,1370.8 1296.69,1370.8 1317.25,1391.36 1323.1,1391.36 1328.94,1385.51 1328.94,1379.67 1308.38,1359.1 1308.38,1353.26 1314.23,1347.41 1320.07,1347.41 1340.63,1367.97 1346.48,1367.97 1352.33,1362.13 1352.33,1356.28 1331.76,1335.72 1331.76,1329.87 1337.61,1324.03 1343.46,1324.03 1364.02,1344.59 1369.87,1344.59 1375.71,1338.74 1375.71,1332.9 1354.16,1311.34 1354.16,1305.5 1360,1299.65 1365.85,1299.65 1387.4,1321.2 1393.25,1321.2 1399.1,1315.36 1399.1,1309.51 1376.48,1286.89 1376.48,1281.05 1382.32,1275.2 1388.17,1275.2 1407.89,1294.92 1413.74,1294.92 1437.01,1271.65 1618.11,1271.65 1692.91,1196.85 U4.J17@1692.91,1118.11
FLASH_D7: U4.J16 U6.J8 | length 1735.2
  L1 (TOP) w3.54: 1680.71,1139.53 1680.71,1098.82 U4.J16@1692.91,1086.61
  L1 (TOP) w4.72: U6.J8@1181.1,1692.91 1169.29,1681.1 1169.29,1476.38 1172.46,1473.21 1174.13,1471.54 1176.79,1468.88 1176.79,1463.04 1147.14,1433.39 1147.14,1427.55 1152.99,1421.7 1158.83,1421.7 1191,1453.87 1196.84,1453.87 1202.69,1448.02 1202.69,1442.17 1170.52,1410.01 1170.52,1404.16 1176.37,1398.31 1182.22,1398.31 1214.38,1430.48 1220.23,1430.48 1226.07,1424.64 1226.07,1418.79 1193.91,1386.62 1193.91,1380.78 1199.75,1374.93 1205.6,1374.93 1237.77,1407.1 1243.61,1407.1 1249.46,1401.25 1249.46,1395.4 1217.29,1363.24 1217.29,1357.39 1223.14,1351.55 1228.98,1351.55 1261.15,1383.71 1267,1383.71 1272.84,1377.87 1272.84,1372.02 1240.68,1339.85 1240.68,1334.01 1246.52,1328.16 1252.37,1328.16 1284.54,1360.33 1290.38,1360.33 1296.23,1354.48 1296.23,1348.64 1264.06,1316.47 1264.06,1310.62 1269.91,1304.78 1275.75,1304.78 1307.92,1336.94 1313.77,1336.94 1319.61,1331.1 1319.61,1325.25 1287.45,1293.08 1287.45,1287.24 1293.29,1281.39 1299.14,1281.39 1331.31,1313.56 1337.15,1313.56 1343,1307.71 1343,1301.87 1310.83,1269.7 1310.83,1263.85 1316.68,1258.01 1322.52,1258.01 1352.17,1287.65 1358.02,1287.65 1359.69,1285.98 1389.76,1255.91 1614.17,1255.91 1680.91,1189.17 1680.91,1139.73 1680.71,1139.53
FLASH_OE: U4.P15 U6.D4 | length 1651.3
  L1 (TOP) w3.54: 1811.02,1130.48 1806.69,1126.15 1806.69,1113.06 1813.84,1105.91 1835.04,1105.91 1838.58,1102.36 1858.27,1102.36 1866.14,1094.49 1866.14,1070.87 U4.P15@1850.39,1055.12
  L1 (TOP) w4.72: U6.D4@1338.58,1818.9 1354.33,1834.65 1354.33,1858.27 1362.2,1866.14 1409.45,1866.14 1425.2,1850.39 1464.57,1850.39 1472.44,1858.27 1472.44,1915.35 1490.16,1933.07 1606.3,1933.07 1610.88,1928.49 1612.55,1926.82 1619.79,1926.82 1630.12,1937.15 1637.36,1937.15 1644.6,1929.92 1644.6,1922.68 1617.06,1895.14 1617.06,1887.9 1624.3,1880.66 1631.54,1880.66 1659.07,1908.2 1666.31,1908.2 1673.55,1900.96 1673.55,1893.72 1646.01,1866.19 1646.01,1858.95 1653.25,1851.71 1660.49,1851.71 1688.02,1879.25 1695.26,1879.25 1702.5,1872.01 1702.5,1864.77 1674.96,1837.24 1674.96,1830 1682.2,1822.76 1689.44,1822.76 1699.41,1832.73 1706.64,1832.73 1713.27,1826.1 1716.54,1822.83 1716.54,1748.03 1795.28,1669.29 1795.28,1460.63 1814.96,1440.94 1814.96,1134.42 1811.02,1130.48
FLASH_R_RDY: R28.2 U6.C8 | length 307.2
  L1 (TOP) w3.54: R28.2@1537.4,1535.43 R28.2@1539.37,1535.43
  L1 (TOP) w4.72: v1(1370.08,1645.67) U6.C8@1370.08,1692.91 ; v1(1448.82,1645.67) 1464.57,1645.67 1472.44,1637.8 1472.44,1606.3 1480.32,1598.43 1519.69,1598.43 1537.4,1580.71 R28.2@1537.4,1535.43
  L4 (BOTTOM) w4.72: v1(1370.08,1645.67) v1(1448.82,1645.67)
FLASH_RDY: R26.1 R28.1 U4.M17 | length 1318.6
  L1 (TOP) w3.54: R28.1@1602.36,1535.43 R28.1@1604.33,1533.46
  L1 (TOP) w4.72: R26.1@1598.43,1582.68 1602.36,1578.74 R28.1@1602.36,1535.43 ; R28.1@1604.33,1533.46 1625.02,1533.46 1628.36,1533.46 1681.67,1586.78 1688.91,1586.78 1696.15,1579.54 1696.15,1572.3 1635.89,1512.04 1635.89,1504.8 1643.13,1497.57 1650.37,1497.57 1710.62,1557.82 1717.86,1557.82 1725.1,1550.59 1725.1,1543.35 1664.84,1483.09 1664.84,1475.85 1672.08,1468.61 1679.32,1468.61 1739.58,1528.87 1746.81,1528.87 1754.05,1521.63 1754.05,1514.4 1693.79,1454.14 1693.79,1446.9 1701.03,1439.66 1708.27,1439.66 1743.01,1474.4 1750.25,1474.4 1757.48,1467.16 1757.48,1459.92 1722.75,1425.19 1722.75,1417.95 1729.98,1410.71 1737.22,1410.71 1771.9,1445.39 1779.14,1445.39 1786.38,1438.15 1786.38,1430.91 1751.7,1396.23 1751.7,1389 1758.94,1381.76 1766.18,1381.76 1775.2,1390.79 1782.44,1390.79 1785.43,1387.8 1791.34,1381.89 1791.34,1141.73 1787.4,1137.8 U4.M17@1787.4,1118.11
FLASH_WE: U4.N14 U6.C7 | length 1640
  L1 (TOP) w3.54: 1768.11,1137.8 1768.11,1062.6 1771.65,1059.06 1771.65,1041.45 1773.73,1039.37 1803.15,1039.37 U4.N14@1818.9,1023.62
  L1 (TOP) w4.72: U6.C7@1370.08,1724.41 1385.83,1708.66 1385.83,1606.3 1417.32,1574.8 1417.32,1555.12 1428.75,1543.7 1428.75,1536.46 1401.79,1509.51 1401.79,1502.27 1409.03,1495.03 1416.27,1495.03 1449.96,1528.72 1457.19,1528.74 1464.42,1521.5 1464.42,1514.26 1430.75,1480.55 1430.75,1473.32 1437.98,1466.08 1445.22,1466.08 1478.93,1499.79 1486.14,1499.79 1493.13,1492.79 1494.52,1491.41 1494.52,1486.45 1493.38,1485.31 1458.67,1450.57 1458.67,1445.39 1466.94,1437.13 1474.17,1437.13 1491.93,1454.88 1501.62,1464.57 1509.64,1464.57 1514.76,1459.45 1514.76,1432.19 1519.88,1427.07 1530.12,1427.07 1535.24,1432.19 1535.24,1461.29 1540.35,1466.41 1550.59,1466.41 1555.71,1461.29 1555.71,1432.19 1560.83,1427.07 1571.06,1427.07 1576.18,1432.19 1576.18,1461.29 1581.3,1466.41 1591.53,1466.41 1596.65,1461.29 1596.65,1432.19 1601.77,1427.07 1612.01,1427.07 1617.12,1432.19 1617.12,1459.45 1622.24,1464.57 1627.43,1464.57 1629.79,1464.57 1637.8,1464.57 1651.62,1450.74 1651.62,1443.51 1642.71,1434.6 1642.71,1427.36 1649.95,1420.12 1657.19,1420.12 1670.15,1433.09 1677.39,1433.09 1684.63,1425.85 1684.63,1418.61 1671.66,1405.65 1671.66,1398.41 1678.9,1391.17 1686.14,1391.17 1699.11,1404.14 1706.34,1404.14 1713.58,1396.9 1713.58,1389.66 1700.62,1376.69 1700.62,1369.46 1707.85,1362.22 1715.09,1362.22 1728.06,1375.18 1735.3,1375.18 1742.53,1367.95 1742.53,1360.71 1729.57,1347.74 1729.57,1340.5 1736.81,1333.27 1744.04,1333.27 1752.95,1342.17 1760.19,1342.17 1767.72,1334.65 1767.72,1138.19 1768.11,1137.8
FLASH_WP: R27.1 R29.2 U6.C3 | length 882.7
  L1 (TOP) w7.87: R29.2@933.07,1732.28 R27.1@933.07,1787.4 933.07,1925.2 960.63,1952.76 1433.07,1952.76 1448.82,1937.01 v1(1448.82,1866.14) ; U6.C3@1370.08,1850.39 v1(1393.7,1850.39)
  L4 (BOTTOM) w7.87: v1(1393.7,1850.39) 1433.07,1850.39 v1(1448.82,1866.14)